# Altium PCB MainPCB.PcbDoc (part 2 of 3)
Units mm, origin at the board's own origin, x right, y up, seen from the top; angles counter-clockwise.
Board outline 200.18 x 193.98 mm, 4 copper layers (Top Layer, PWR, GND, Bottom Layer), stack 1.566 mm thick; 92 components, 81 nets, 391 pads, 267 vias.
Unrouted connection lines stored in the file: 114.
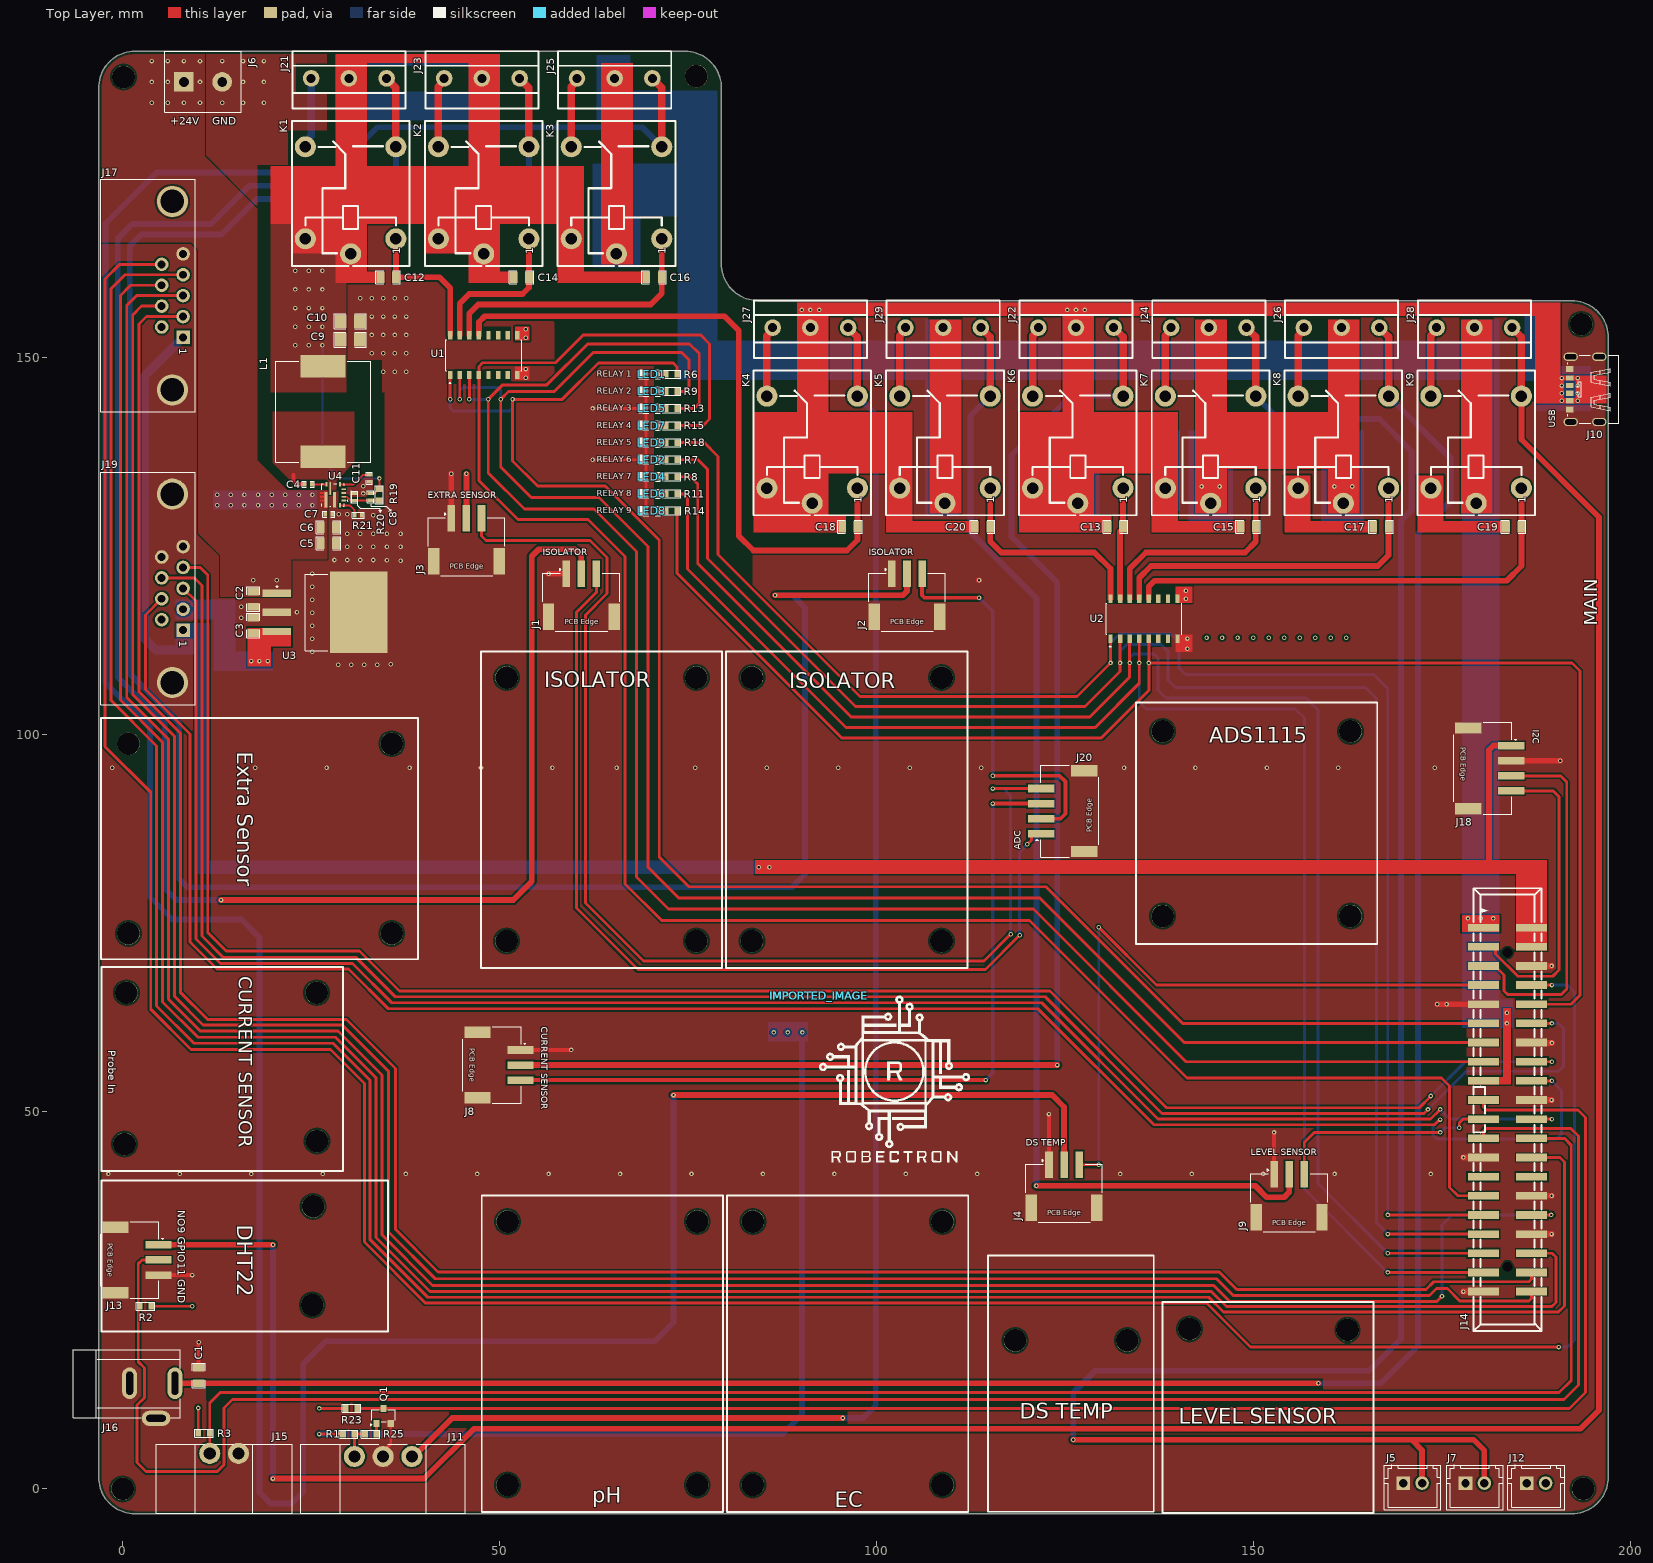
[diagram p0: Top Layer view]

## Via types
v1: diameter 0.6, hole 0.3, Top Layer to Bottom Layer, 267 vias

## Nets (pads, with @x,y where several pads share a name; then routed paths per layer and width w, separated by ;. In a path a pad name is that pad's centre, name@x,y a point inside that pad or via, vN(x,y) a via of type N, cw(c..) or ccw(c..) an arc to the next point about the centre after c; other vN are vias at no path point) (continued)
5V_EX: (continued)
  other v1: 140.995,118.034 140.995,119.101 190.83,144.298 192.968,144.298 190.83,145.298 192.968,145.298 190.83,146.298 192.968,146.298 190.83,147.298 192.968,147.298 22.897,151.638 24.7,151.638 53.467,152.625 53.467,153.768 22.897,154.11 24.7,154.11 26.503,154.11 90.043,156.337 91.207,156.337 92.37,156.337 125.259,156.337 126.423,156.337 127.587,156.337 22.897,156.583 24.7,156.583 26.503,156.583 22.897,159.055 24.7,159.055 26.503,159.055 22.897,161.527 24.7,161.527 26.503,161.527
12V: C3.2 J19.2 J24.2 J26.2 K7.5 K8.5 U3.3
  other v1: 17.072,109.766 18.151,109.766 19.231,109.766 143.739,112.852 145.796,112.852 147.853,112.852 149.911,112.852 151.968,112.852 154.026,112.852 156.083,112.852 158.14,112.852 160.198,112.852 162.255,112.852 143.078,132.918 145.458,132.918 160.686,132.918 163.066,132.918
+24V: C2.2 C5.2 C6.2 C7.2 J6.1 U3.1 U4.8
  other v1: 17.332,120.472 20.448,120.472 12.548,130.429 14.351,130.429 16.154,130.429 17.958,130.429 19.761,130.429 21.565,130.429 23.368,130.429 25.171,130.429 12.548,131.807 14.351,131.807 16.154,131.807 17.958,131.807 19.761,131.807 21.565,131.807 23.368,131.807 25.171,131.807 3.861,183.794 5.994,183.794 8.128,183.794 10.262,183.794 3.861,186.563 5.994,186.563 10.262,186.563 3.861,189.332 5.994,189.332 8.128,189.332 10.262,189.332
A0: J1.3 J20.1 | length 124.6
  Top Layer w0.381: J1.3@62.833,121.341 62.833,118.898 60.184,116.25 60.184,77.024 68.324,68.885 114.413,68.885 v1(118.954,73.425) ; v1@119.984,85.49 120.513,86.02 120.513,86.558 120.822,86.868 J20.1@121.793,86.868
  Bottom Layer w0.381: v1(118.954,73.425) 118.954,84.461 v1(119.964,85.471)
A1: J2.3 J20.2 | length 52.6
  Top Layer w0.508: J2.3@106.013,121.341 106.013,118.491 106.343,118.161 v1(113.563,118.161) ; v1(115.392,94.564) 124.231,94.564 125.012,93.784 125.012,89.519 124.361,88.868 J20.2@121.793,88.868
  Bottom Layer w0.508: v1(113.563,118.161) 115.392,116.332 v1(115.392,94.564)
A2: J8.3 J20.3 | length 105.1
  Top Layer w0.508: J8.3@52.767,54.204 v1(114.452,54.204) ; v1(115.392,90.868) J20.3@121.793,90.868
  Bottom Layer w0.508: v1(114.452,54.204) 115.392,55.143 v1(115.392,90.868)
A3: J3.3 J20.4 | length 155.8
  Top Layer w0.381: J3.3@47.593,128.707 47.593,126.368 48.208,125.754 61.981,125.754 64.237,123.499 64.237,118.72 61.366,115.849 61.366,77.699 69.074,69.991 114.213,69.991 v1(117.754,73.533) ; v1(115.392,92.868) J20.4@121.793,92.868
  Bottom Layer w0.381: v1(115.392,92.868) 116.834,92.868 117.754,91.948 v1(117.754,73.533)
GND: C1.1 C2.1 C3.1 C5.1 C6.1 C7.1 C9.1 C10.1 C11.1 J1.1 J1.MP1 J1.MP2 J2.1 J2.MP1 J2.MP2 J3.1 J3.MP1 J3.MP2 J4.1 J4.MP1 J4.MP2 J5.1 J6.2 J7.1 J8.1 J8.MP1 J8.MP2 J9.1 J9.MP1 J9.MP2 J10.7 J10.A12 J10.B12 J11.2 J12.1 J13.3 J13.MP1 J13.MP2 J14.6 J14.9 J14.14 J14.20 J14.25 J14.30 J14.34 J14.39 J15.2 J16.2 J16.3 J17.5 J17.S1 J17.S2 J18.2 J18.MP1 J18.MP2 J19.5 J19.9 J19.S1 J19.S2 J20.MP1 J20.MP2 LED1.2 LED2.2 LED3.2 LED4.2 LED5.2 LED6.2 LED7.2 LED8.2 LED9.2 Q1.2 R20.1 R21.1 U1.8 U2.8 U3.2 U3.4 U4.3 U4.9 | length 103.4
  Top Layer w0.381: J11.2@34.544,4.293 34.544,4.947 35.558,5.961 Q1.2@35.558,8.661 ; v1(62.312,136.471) LED2.2@69.418,136.471 ; v1(62.312,143.262) LED5.2@69.418,143.262 ; LED8.2@69.418,129.681 LED6.2@69.418,131.944 LED4.2@69.418,134.208 LED2.2@69.418,136.471 ; LED1.2@69.418,147.789 LED3.2@69.418,145.525 LED5.2@69.418,143.262 ; LED2.2@69.418,136.471 LED9.2@69.418,138.735 LED7.2@69.418,140.998 LED5.2@69.418,143.262
  Top Layer w0.508: J13.3@4.755,28.353 v1(9.22,28.353) ; C1.1@10.084,16.041 v1(10.084,19.431) ; J8.1@52.768,58.197 v1(59.487,58.197) ; J4.1@122.841,42.982 v1(122.841,49.701) ; J9.1@152.686,41.712 v1(152.686,47.269)
  Top Layer w0.762: v1(43.586,134.62) 43.593,134.613 J3.1@43.593,128.707 ; v1(56.483,121.341) J1.1@58.833,121.341 ; v1@113.557,120.491 v1(113.563,120.498) ; v1(174.32,64.262) J14.9@180.442,64.262 ; v1(177.8,26.162) J14.39@180.442,26.162 ; v1(177.8,43.942) J14.25@180.442,43.942 ; J18.2@184.15,96.552 190.646,96.552 v1(190.652,96.545) ; J14.34@186.842,33.782 v1(189.484,33.782) ; J14.30@186.842,38.862 v1(189.484,38.862) ; J14.20@186.842,51.562 v1(189.484,51.562) ; J14.14@186.842,59.182 186.893,59.131 v1(189.535,59.131) ; J14.6@186.842,69.342 v1(189.484,69.342)
  other v1: -1.88,41.758 7.595,41.758 17.069,41.758 26.543,41.758 37.541,41.758 47.015,41.758 56.49,41.758 65.964,41.758 75.438,41.758 84.912,41.758 94.386,41.758 103.861,41.758 113.335,41.758 132.283,41.758 141.757,41.758 151.232,41.758 160.706,41.758 173.482,41.758 175.565,64.262 -1.372,95.606 17.577,95.606 27.051,95.606 38.049,95.606 47.523,95.606 56.998,95.606 65.507,95.606 75.946,95.606 85.42,95.606 94.894,95.606 104.369,95.606 113.843,95.606 132.791,95.606 142.265,95.606 151.74,95.606 161.214,95.606 173.99,95.606 28.591,109.29 30.312,109.29 32.032,109.29 33.753,109.29 35.557,109.335 25.15,111.01 141.199,111.404 25.15,112.731 141.199,112.754 25.15,114.451 15.725,115.519 25.15,116.172 23.114,116.23 15.725,116.967 25.15,117.892 25.15,119.613 25.15,121.333 36.853,123.08 35.049,123.126 28.083,123.171 29.804,123.171 31.524,123.171 33.245,123.171 29.804,124.917 31.524,124.917 33.245,124.917 35.049,124.917 36.853,124.917 29.804,126.663 31.524,126.663 33.245,126.663 35.049,126.663 36.853,126.663 33.245,129.102 28.677,129.235 29.804,129.235 31.899,131.999 31.899,132.964 53.467,147.345 34.569,148.133 36.093,148.133 37.617,148.133 53.467,148.488 33.045,150.571 34.569,150.571 36.093,150.571 37.617,150.571 33.045,153.01 34.569,153.01 36.093,153.01 37.617,153.01 33.045,155.448 34.569,155.448 36.093,155.448 37.617,155.448 31.521,157.886 33.045,157.886 34.569,157.886 36.093,157.886 37.617,157.886 13.208,183.794 15.977,183.794 18.745,183.794 15.977,186.563 18.745,186.563 13.208,189.332 15.977,189.332 18.745,189.332
GPIO2: J14.3 J18.4 | length 42
  Top Layer w0.381: J14.3@180.442,71.882 181.749,71.882 182.069,71.563 182.069,70.927 185.025,67.97 189.636,67.97 190.475,68.809 190.475,91.782 189.704,92.552 J18.4@184.15,92.552
GPIO3: J14.5 J18.3 | length 49.3
  Top Layer w0.381: J14.5@180.442,69.342 180.762,69.023 182.31,69.023 183.192,68.141 183.192,66.036 183.696,65.532 190.734,65.532 191.504,66.302 191.504,93.719 190.671,94.552 J18.3@184.15,94.552
GPIO4: J4.3 J14.7 | length 88.3
  Top Layer w0.381: J4.3@126.846,42.977 126.851,42.982 v1(129.438,42.982) ; v1(129.438,74.473) 137.109,66.802 J14.7@180.442,66.802
  Bottom Layer w0.381: v1(129.438,42.982) v1(129.438,74.473)
GPIO5: J14.29 R15.2 U1.4 | length 268.4
  Top Layer w0.381: R15.2@73.533,140.998 76.994,140.998 77.843,141.847 77.843,151.834 76.667,153.01 61.087,153.01 57.404,149.327 47.727,149.327 47.248,148.848 U1.4@47.248,147.703 47.248,133.689 52.414,128.523 61.733,128.523 66.639,123.617 66.639,80.217 71.485,75.371 120.239,75.371 141.127,54.483 174.904,54.483 175.946,53.442 175.946,39.98 177.063,38.862 J14.29@180.442,38.862
GPIO6: J14.31 R18.2 U2.1 | length 211.5
  Top Layer w0.381: R18.2@73.533,138.735 77.12,138.735 78.941,136.913 78.941,123.898 97.778,105.062 126.536,105.062 v1(131,109.526) U2.1@131,112.754 ; v1(167.767,36.322) J14.31@180.442,36.322
  Bottom Layer w0.381: v1(131,109.526) 131,112.197 132.198,113.395 138.936,113.395 140.082,112.249 140.082,108.855 140.959,107.978 165.908,107.978 167.767,106.119 v1(167.767,36.322)
GPIO7: J14.26 J17.4 | length 347.8
  Top Layer w0.381: J17.4@8.024,160.992 0.301,160.992 -1.551,159.14 -1.551,104.563 4.511,98.501 4.511,64.039 9.458,59.092 27.905,59.092 32.83,54.166 32.83,33.034 40.454,25.41 144.033,25.41 145.989,23.454 190.382,23.454 191.186,24.259 191.186,43.342 190.586,43.942 J14.26@186.842,43.942
GPIO8: J14.24 J15.1 R3.2 | length 225.3
  Top Layer w0.381: J15.1@11.557,4.699 R3.2@11.557,7.366 11.557,11.37 12.945,12.758 190.491,12.758 192.098,14.365 192.098,45.57 191.186,46.482 J14.24@186.842,46.482
GPIO9: J9.3 J14.21 | length 29.6
  Top Layer w0.381: J9.3@156.686,41.712 156.686,45.942 158.013,47.269 v1(174.727,47.269) ; v1(177.241,47.879) 177.241,48.514 177.749,49.022 J14.21@180.442,49.022
  Bottom Layer w0.381: v1(174.727,47.269) 174.74,47.269 175.349,47.879 v1(177.241,47.879)
GPIO10: J14.19 Q1.3 R23.2 | length 215.3
  Top Layer w0.381: R23.2@31.115,10.661 Q1.3@34.608,10.661 191.867,10.661 193.984,12.778 193.984,49.24 192.982,50.241 180.823,50.241 180.442,50.622 J14.19@180.442,51.562
GPIO11: J13.2 J14.23 R2.2 | length 278
  Top Layer w0.381: J13.2@4.755,30.353 2.583,30.353 2.083,29.853 2.083,24.207 2.083,16.863 2.898,16.048 2.898,12.078 1.922,11.102 1.922,3.482 3.118,2.286 12.547,2.286 13.449,3.188 13.449,10.734 14.57,11.855 191.152,11.855 193.055,13.758 193.055,46.788 192.04,47.803 180.823,47.803 180.442,47.422 J14.23@180.442,46.482
GPIO12: J14.32 J17.3 | length 327.6
  Top Layer w0.381: J17.3@8.024,158.222 1.853,158.222 0.553,156.923 0.553,104.938 6.086,99.406 6.086,64.934 10.288,60.732 28.571,60.732 34.403,54.899 34.403,33.685 41.106,26.983 144.685,26.983 146.804,24.864 174.267,24.864 v1(174.955,25.552) ; J14.32@186.842,36.322 v1(189.459,36.322)
  Bottom Layer w0.381: v1(174.955,25.552) 174.955,35.001 176.276,36.322 v1(189.459,36.322)
GPIO13: J14.33 R7.2 U2.2 | length 210.9
  Top Layer w0.381: R7.2@73.533,136.471 76.279,136.471 77.54,135.21 77.54,123.358 97.173,103.725 127.601,103.725 132.27,108.394 v1(132.27,109.526) U2.2@132.27,112.754 ; v1(167.767,33.782) J14.33@180.442,33.782
  Bottom Layer w0.381: v1(132.27,109.526) 132.27,111.078 133.164,111.971 137.68,111.971 138.646,111.006 138.646,107.209 139.606,106.248 164.78,106.248 166.262,104.767 166.262,35.287 v1(167.767,33.782)
GPIO14: J14.8 J17.9 | length 379.9
  Top Layer w0.381: J17.9@5.184,162.377 -0.386,162.377 -2.317,160.446 -2.317,98.418 3.727,92.373 3.727,63.608 9.089,58.247 27.581,58.247 32.058,53.77 32.058,32.714 40.134,24.638 143.713,24.638 149.555,18.796 v1(190.424,18.796) ; J14.8@186.842,66.802 v1(189.535,66.802)
  Bottom Layer w0.381: v1(189.535,66.802) 191.58,66.802 192.507,65.875 192.507,19.66 191.643,18.796 v1(190.424,18.796)
GPIO15: J14.10 R14.2 U2.5 | length 196.9
  Top Layer w0.381: R14.2@73.533,129.681 73.533,121.403 95.345,99.591 129.817,99.591 136.081,105.855 v1(136.081,109.526) ; U2.5@136.081,112.754 v1(136.081,109.526) ; J14.10@186.842,64.262 192.071,64.262 193.259,65.45 193.259,108.445 192.178,109.526 v1(136.081,109.526)
GPIO16: J14.36 J17.8 | length 325.6
  Top Layer w0.381: J17.8@5.184,159.607 1.058,159.607 -0.289,158.26 -0.289,104.602 5.298,99.014 5.298,64.572 9.982,59.888 28.228,59.888 33.6,54.516 33.6,33.353 40.773,26.18 144.352,26.18 146.37,24.161 189.515,24.161 190.068,24.714 190.068,30.732 189.558,31.242 J14.36@186.842,31.242
GPIO17: J14.11 R6.2 U1.1 | length 231.6
  Top Layer w0.381: v1(43.438,144.475) U1.1@43.438,147.703 ; R6.2@73.533,147.789 73.533,148.783 73.015,149.301 63.122,149.301 58.297,144.477 v1(51.714,144.477) 51.714,136.3 55.008,133.006 63.96,133.006 71.159,125.807 71.159,83.807 75.119,79.847 122.448,79.847 140.573,61.722 J14.11@180.442,61.722
  Bottom Layer w0.381: v1(43.438,144.475) 43.438,143.328 43.84,142.926 51.31,142.926 51.714,143.33 v1(51.714,144.477)
GPIO18: J14.12 J19.8 | length 254.6
  Top Layer w0.381: J19.8@5.184,120.797 9.516,120.797 10.51,119.803 10.51,73.311 13.329,70.493 30.919,70.493 36.157,65.254 122.355,65.254 137.833,49.776 172.56,49.776 v1(173.101,50.317) ; J14.12@186.842,61.722 v1(189.535,61.722)
  Bottom Layer w0.381: v1(173.101,50.317) 178.166,55.383 190.412,55.383 191.059,56.029 191.059,61.075 190.412,61.722 v1(189.535,61.722)
GPIO19: J14.35 R8.2 U2.3 | length 206.7
  Top Layer w0.381: R8.2@73.533,134.208 75.318,134.208 76.26,133.266 76.26,122.725 96.621,102.364 128.246,102.364 133.541,107.658 v1(133.541,109.526) U2.3@133.541,112.754 ; v1(167.767,31.242) J14.35@180.442,31.242
  Bottom Layer w0.381: v1(133.541,109.526) 133.541,110.248 134.008,110.715 136.757,110.715 137.294,110.179 137.294,105.906 138.348,104.851 156.947,104.851 158.523,103.275 158.523,40.486 v1(167.767,31.242)
GPIO20: J14.38 J17.2 | length 306.6
  Top Layer w0.381: J17.2@8.024,155.452 3.167,155.452 2.168,154.453 2.168,105.697 7.654,100.211 7.654,65.858 11.284,62.228 29.698,62.228 36.17,55.757 36.17,34.417 41.837,28.749 145.416,28.749 147.75,26.416 172.818,26.416 173.86,27.457 186.481,27.457 186.842,27.818 J14.38@186.842,28.702
GPIO21: J14.40 J17.7 | length 308
  Top Layer w0.381: J17.7@5.184,156.837 2.51,156.837 1.343,155.67 1.343,105.328 6.878,99.793 6.878,65.314 10.663,61.529 29.133,61.529 35.28,55.381 35.28,34.049 41.469,27.86 145.048,27.86 147.279,25.629 173.281,25.629 174.219,26.567 175.666,26.567 177.315,24.917 186.481,24.917 186.842,25.278 J14.40@186.842,26.162
GPIO22: J14.15 R13.2 U1.3 | length 246.5
  Top Layer w0.381: v1(45.974,144.475) 45.976,144.477 U1.3@45.978,147.703 U1.3@45.978,147.703 ; R13.2@73.533,143.262 75.805,143.262 76.463,143.92 76.463,150.536 75.171,151.828 61.683,151.828 56.254,146.399 50.412,146.399 v1(48.489,144.475) 48.489,134.724 53.276,129.937 62.526,129.937 68.148,124.315 68.148,81.121 72.394,76.875 120.767,76.875 141,56.642 J14.15@180.442,56.642
  Bottom Layer w0.381: v1(45.974,144.475) v1(48.489,144.475)
GPIO23: J14.16 J19.4 | length 244.2
  Top Layer w0.381: J19.4@8.024,122.182 10.29,122.182 11.295,121.177 11.295,73.77 13.755,71.309 31.401,71.309 36.698,66.012 122.963,66.012 138.434,50.542 171.928,50.542 v1(173.482,52.095) ; J14.16@186.842,56.642 v1(189.535,56.642)
  Bottom Layer w0.381: v1(173.482,52.095) 178.029,56.642 v1(189.535,56.642)